# Altium PCB 400535.PcbDoc (part 3 of 3)
Units mil, origin at the board's own origin, x right, y up, seen from the top; angles counter-clockwise.
Board outline 2125.98 x 2500 mil, 4 copper layers (Top Layer, Mid-Layer 1, Mid-Layer 2, Bottom Layer), stack 93.792 mil thick; 80 components, 40 nets, 250 pads, 682 vias.
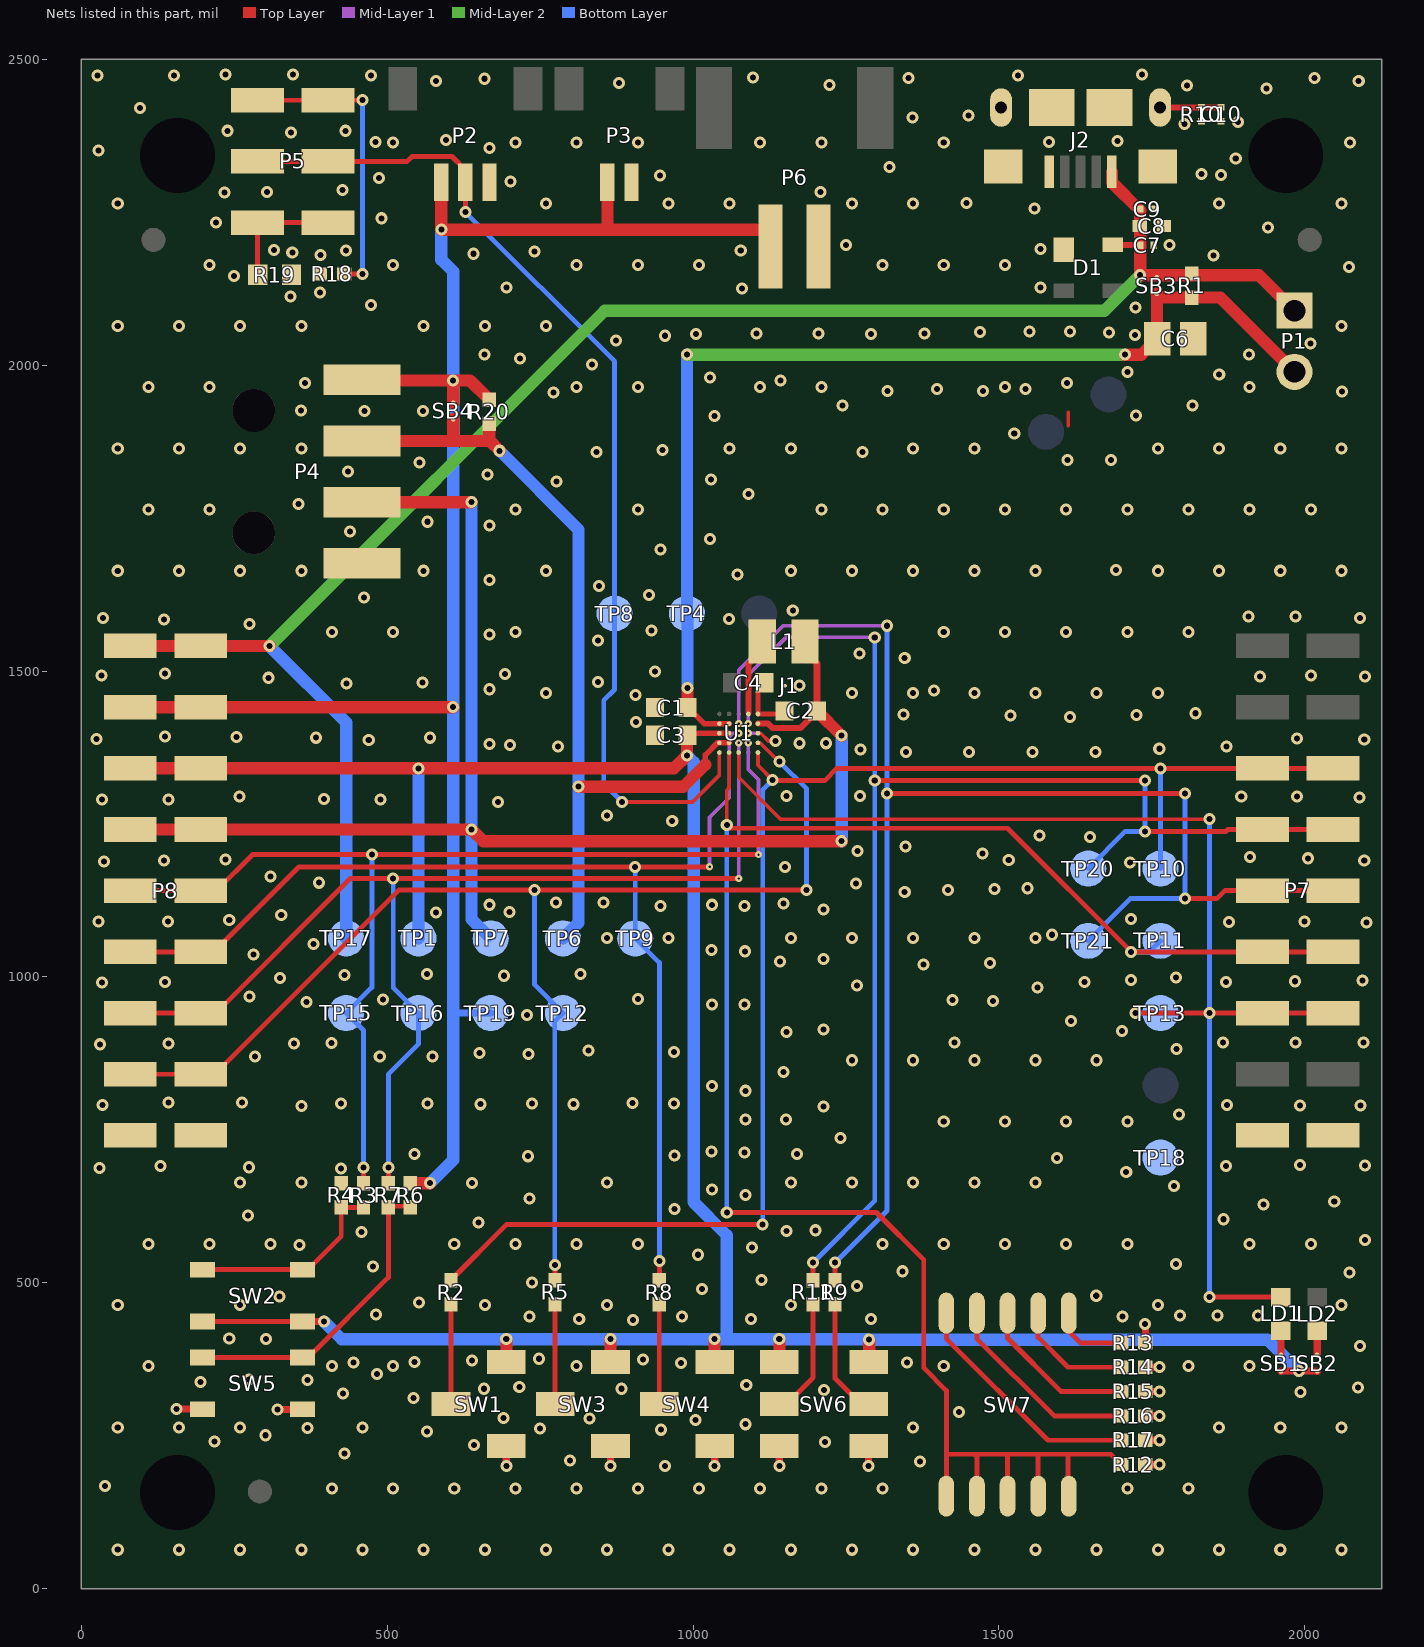
[diagram p4: the nets of this part, all layers, seen from the top]

## Via types
v1: diameter 19.68, hole 9.84, Top Layer to Bottom Layer, tented both sides, 673 vias
v2: diameter 11.81, hole 3.94, Top Layer to Mid-Layer 1, tented top, 8 vias
v3: diameter 11.81, hole 3.94, Top Layer to Mid-Layer 1, tented both sides, 1 vias

## Nets (pads, with @x,y where several pads share a name; then routed paths per layer and width w, separated by ;. In a path a pad name is that pad's centre, name@x,y a point inside that pad or via, vN(x,y) a via of type N, cw(c..) or ccw(c..) an arc to the next point about the centre after c; other vN are vias at no path point) (continued)
ERR: LD1.1 P7.7 TP13.1 U1.E3 | length 2099.9
  Top Layer w5.91: U1.E3@1074.62,1366.81 1074.62,1326.38 1143,1258 v1(1844,1258)
  Top Layer w8: v1(1723,941) P7.7@1930.51,941 P7.7@2045.87,941 ; v1@1844,476.81 LD1.1@1960.87,476.81
  Bottom Layer w8: v1(1723,941) TP13.1@1764,940.95 TP13.1@1764,940.95 ; v1(1844,477) v1(1844,1258)
  other v1: 1844,941
GND: C1.1 C3.1 C6.1 C7.2 C8.2 C9.2 C10.2 D1.1 J1.2 J2.5 P2.1 P3.1 P4.4 P6.1 P7.9 P8.9 R4.2 R10.2 R12.1 R13.1 R14.1 R15.1 R16.1 R17.1 R18.1 R19.1 SW1.3 SW3.3 SW4.3 SW5.2 SW6.1 SW6.4 TP18.1 U1.C4 U1.C5 | length 462
  Top Layer w5.91: 1613,1901 1613,1923
  Top Layer w6: U1.C5@1106.12,1398.31 1110.69,1398.31 1123.44,1385.56 v1(1134.58,1385.56)
  Top Layer w12: v1(156,294) 197.72,294 SW5.2@198.31,293.4 ; v1(321,293) 361.3,293 SW5.2@361.7,293.4 ; v1(695,200.81) SW1.3@695,233.11 ; v1(865.14,200.81) SW3.3@865.14,233.11 ; v1(1035.28,200.81) SW4.3@1035.28,233.11 ; v1(1141.17,200.81) SW6.4@1141.17,233.11 ; v1(1286.83,200.81) SW6.1@1286.83,233.11 ; v1(1739,433) 1739.37,432.63 R13.1@1739.37,402 ; R12.1@1739.37,203 v1(1762.74,203) ; R17.1@1739.37,242.8 v1(1762.74,242.8) ; R16.1@1739.37,282.6 v1(1762.74,282.6) ; R15.1@1739.37,322.4 v1(1762.74,322.4) ; R14.1@1739.37,362.2 v1(1762.74,362.2)
  Mid-Layer 1 w6: v3(1090.37,1398.31) 1103.69,1398.31
  other v1: 59.75,63.87 159.75,63.87 259.75,63.87 359.75,63.87 459.75,63.87 559.75,63.87 659.75,63.87 759.75,63.87 859.75,63.87 959.75,63.87 1059.75,63.87 1159.75,63.87 1259.75,63.87 1359.75,63.87 1459.75,63.87 1559.75,63.87 1659.75,63.87 1759.75,63.87 1859.75,63.87 1959.75,63.87 2059.75,63.87 409.75,163.87 509.75,163.87 609.75,163.87 709.75,163.87 809.75,163.87 909.75,163.87 1009.75,163.87 1109.75,163.87 1209.75,163.87 1309.75,163.87 1709.75,163.87 1809.75,163.87 39,168 954,201 1371,208 799,210 430,221 642,235 1216,240 218,241 301,251 565,257 948,260 750,262 370,263 59.75,263.87 159.75,263.87 259.75,263.87 459.75,263.87 1359.75,263.87 1859.75,263.87 1959.75,263.87 2059.75,263.87 1086,269 1004,276 831,278 690,279 1435,289 543,312 428,319 1993,322 1214,325 658,327 883,327 2087,329 716,330 1087,333 195,338 370,341 274,342 483.6,351.4 109.75,363.87 409.75,363.87 509.75,363.87 809.75,363.87 1409.75,363.87 1809.75,363.87 1909.75,363.87 980,369 445,370 1350,370 545,371 639,373 918,375 748,376 2090,397 302,408 242,409 902,439 814,441 1095,441 1291,441 733,445 982,445 1702,445 1796,447 1857,447 1923,447 482,448 59.75,463.87 259.75,463.87 659.75,463.87 859.75,463.87 1159.75,463.87 1759.75,463.87 2059.75,463.87 552,468 324,478 1659,479 1015,490 1268,495 737,501 1112,505 2073,517 1342,519 477,527 1789,531 1008,546 1096,558 357,562 109.75,563.87 209.75,563.87 309.75,563.87 609.75,563.87 709.75,563.87 809.75,563.87 909.75,563.87 1309.75,563.87 1409.75,563.87 1509.75,563.87 1609.75,563.87 1709.75,563.87 1909.75,563.87 2009.75,563.87 2098,570 458,583 1153,585 1200,586 649,599 1867,604 273,610 970,621 1932,628 2048,633 733,638 1086,644 1031,653 1786,658 639,663 259.75,663.87 359.75,663.87 859.75,663.87 1159.75,663.87 1259.75,663.87 1359.75,663.87 1459.75,663.87 1559.75,663.87 1708,681 425,687 30,688 274,689 130,691 1871,691 2098,692 1992,693 1595,704 730,707 970,708 545,711 1170,711 1084,713 1030,715 1241,737 1409.75,763.87 1509.75,763.87 1609.75,763.87 1709.75,763.87 1086,767 1152,767 1794,775 1213,788 360,789 1992,790 2091,790 35,791 1873,791 653,792 805,792 425,793 566,793 737,793 969,793 901,794 143,795 263,795 1086,814 1031,822 1148,845 1259.75,863.87 1359.75,863.87 1459.75,863.87 1559.75,863.87 1659.75,863.87 284,870 488,870 574,870 731,874 651,876 969,877 829,880 1790,882 31,890 143,891 348,891 409,892 1427,893 1866,893 1985,893 2096,893 1153,910 1701,912 1213,914 1618,928 729,938 1031,955 1084,955 368,959 1490,961 1424,962 493,963 909.75,963.87 275,968 1563,983 1268,986 34,991 137,992 1640,992 1871,992 1984,993 2094,994 1716,995 325,998 1789,999 691,1002 430,1003 565,1005 816,1005 1377,1020 1485,1023 1142,1025 1213,1029 282,1037 1085,1042 1030,1044 380,1054 859.75,1063.87 959.75,1063.87 1159.75,1063.87 1259.75,1063.87 1359.75,1063.87 1459.75,1063.87 1559.75,1063.87 1587,1069 2101,1089 1876,1090 28,1091 142,1091 1999,1091 242,1093 1716,1095 327,1101 580,1105 700,1106 1213,1110 947,1116 1084,1116 667,1118 1031,1118 1148,1120 776,1122 854,1122 1346,1139 1417,1142 1493,1144 1547,1145 1266,1153 389,1154 309.75,1163.87 1150,1180 1714,1187 37,1189 135,1190 2097,1190 1516,1191 236,1192 2005,1194 1910,1196 1473,1202 1269,1206 1347,1213 1649,1229 1566,1231 966,1255 859.75,1263.87 681,1286 34,1290 143,1290 489,1290 397,1291 2089,1293 259,1295 1896,1295 1987,1295 1153,1296 1273,1296 1348,1368 1451.25,1368 1554.5,1368 1657.75,1368 1274,1372 1762,1373 779,1377 1872,1377 701,1379 667,1381 1174,1382 1217,1382 470,1387 2097,1388 25,1389 1987,1390 384,1391 570,1391 254,1392 137,1393 907,1417 1616,1425 1519,1427 1725,1428 1344,1429 1821,1431 906,1461 759.75,1463.87 1259.75,1463.87 1359.75,1463.87 1459.75,1463.87 1559.75,1463.87 1659.75,1463.87 1759.75,1463.87 1394,1468 667,1470.25 1174.03,1476.06 434,1480 558,1481 845,1482 306,1489 1927,1491 2098,1491 33,1493 2010,1493 693,1495 137,1496 938,1499 1346,1521 1272,1529 845,1550 667,1559.5 409.75,1563.87 509.75,1563.87 709.75,1563.87 1409.75,1563.87 1509.75,1563.87 1609.75,1563.87 1709.75,1563.87 1809.75,1563.87 932,1566 275,1577 135,1584 1059,1585 36,1587 2090,1587 1908,1589 1985,1589 1163,1599 462,1620 928,1624 846,1639 667,1648.75 1073,1658 59.75,1663.87 159.75,1663.87 259.75,1663.87 359.75,1663.87 559.75,1663.87 759.75,1663.87 1159.75,1663.87 1259.75,1663.87 1359.75,1663.87 1459.75,1663.87 1559.75,1663.87 1759.75,1663.87 1859.75,1663.87 1959.75,1663.87 2059.75,1663.87 1691,1665 947,1699 1028,1716 439,1728 667,1738 566,1744 109.75,1763.87 209.75,1763.87 709.75,1763.87 909.75,1763.87 1209.75,1763.87 1309.75,1763.87 1409.75,1763.87 1509.75,1763.87 1609.75,1763.87 1709.75,1763.87 1809.75,1763.87 1909.75,1763.87 2009.75,1763.87 355,1773 1091,1789 777,1810 1029,1813 664,1821 436,1826 553,1841 1612,1845 1683,1845 842,1858 1277,1858 950,1861 59.75,1863.87 159.75,1863.87 259.75,1863.87 359.75,1863.87 1059.75,1863.87 1159.75,1863.87 1359.75,1863.87 1459.75,1863.87 1759.75,1863.87 1859.75,1863.87 1959.75,1863.87 2059.75,1863.87 1525,1888 1035,1917 1724,1918 463,1925 559,1925 359,1926 1244,1934 1816,1934 772,1955 2061,1957 1318,1958 1474,1958 1399,1961 1543,1961 109.75,1963.87 209.75,1963.87 809.75,1963.87 909.75,1963.87 1109.75,1963.87 1209.75,1963.87 1509.75,1963.87 1909.75,1963.87 366,1971 1611,1971 1143,1975 1028,1980 1860,1985 1710,1989 835,2001 717,2011 659,2017 1909,2017 2009,2035 874,2040 954,2048 1722,2049 1005,2051 1291,2051 1104,2052 1205,2052 1378,2052 1680,2053 1469,2054 1550,2055 1616,2055 59.75,2063.87 159.75,2063.87 259.75,2063.87 359.75,2063.87 559.75,2063.87 659.75,2063.87 759.75,2063.87 2059.75,2063.87 1723,2094 474,2098 342,2112 390,2119 1080,2125 695,2127 1568,2127 250,2146 2072,2160 209.75,2163.87 509.75,2163.87 809.75,2163.87 909.75,2163.87 1009.75,2163.87 1309.75,2163.87 1409.75,2163.87 1509.75,2163.87 1851,2179 391,2180 641,2182 345,2184 741,2186 433,2187 1078,2187 315,2188 1568,2190 1250,2196 1779,2196 1940,2225 220,2233 491,2240 1558,2256 59.75,2263.87 759.75,2263.87 959.75,2263.87 1059.75,2263.87 1259.75,2263.87 1359.75,2263.87 1859.75,2263.87 2059.75,2263.87 1447,2265 234,2282 304,2283 1208,2283 427,2286 702,2300 487,2306 946,2310 1863,2311 1831,2312 1321,2324 1887,2338 28,2351 667,2355 509.75,2363.87 709.75,2363.87 809.75,2363.87 909.75,2363.87 1109.75,2363.87 1209.75,2363.87 1409.75,2363.87 2074,2364 481,2365 1582,2365 1694,2366 596,2368 343,2380 239,2383 432,2383 1803,2394 1891,2397 1359,2405 1450,2408 96,2420 1937,2452 1807,2457 1223,2458 879,2461 580,2464 2088,2464 659,2468 1352,2469 2016,2469 1098,2470 27,2473 152,2473 474,2473 1531,2473 236,2475 346,2475 1734,2475
ICHG: P7.6 R12.2 SW7.6 SW7.7 SW7.8 SW7.9 SW7.10 TP11.1 U1.E2 | length 3211.4
  Top Layer w5.91: v1(1055.13,1248.13) 1055.13,1305.25 1058.87,1309 U1.E2@1058.87,1366.81
  Top Layer w8: v1(1055.13,615.13) 1299.87,615.13 1377,538 1377,361 1414,324 1414,221 ; v1(1055.13,1248.13) 1060.25,1243 1514,1243 v1(1716,1041) P7.6@1930.51,1041 P7.6@2045.87,1041 ; SW7.6@1414,151.39 1414,221 ; SW7.7@1464,151.39 1464,216 1460,220 ; SW7.8@1514,151.39 1514,220 ; SW7.9@1564,151.39 1564,219 1563,220 ; SW7.10@1614,151.39 1612.94,152.46 1612.94,219.94 1613,220 ; R12.2@1700,203 1683,220 1613,220 ; 1414,221 1415,220 1460,220 ; 1460,220 1514,220 ; 1514,220 1563,220 ; 1563,220 1613,220
  Bottom Layer w8: v1(1055.13,615.13) v1(1055.13,1248.13) ; v1(1716,1041) 1745.94,1041 TP11.1@1764,1059.06
ISET: P8.8 R5.2 TP12.1 U1.D5 | length 2172.3
  Top Layer w5.91: U1.D5@1106.12,1382.56 1109.44,1382.56 1140,1352 v1(1141,1352)
  Top Layer w8: P8.8@80.12,841 P8.8@195.47,841 218,841 519,1142 v1(741,1142) v1(1185.37,1142) ; R5.2@774.59,504.69 v1(774.59,529.59)
  Bottom Layer w8: v1@741,1146 v1(741,1142) 741,987.4 TP12.1@787.4,941 774,927.6 774,530.17 v1(774.59,529.59) ; v1(1141,1352) 1185.67,1307.33 v1@1185.67,1142
MODE: P7.3 R2.2 TP10.1 U1.E5 | length 2423.6
  Top Layer w5.91: U1.E5@1106.12,1366.81 1106.12,1345.88 v1(1130,1322)
  Top Layer w8: R2.2@604.45,504.69 694.87,595.11 v1(1113.89,595.11) ; v1(1130,1322) 1131,1321 1215,1321 1235,1341 v1(1764,1341) P7.3@1930.51,1341 P7.3@2045.87,1341
  Bottom Layer w8: v1(1113.89,595.11) 1113.89,1305.89 v1(1130,1322) ; TP10.1@1764,1177.17 v1(1764,1341)
NetC10_1: C10.1 J2.6@1503.43,2420.96 J2.6@1507.37,2324.51 J2.6@1586.11,2420.96 J2.6@1680.6,2420.96 J2.6@1759.34,2324.51 J2.6@1763.27,2420.96 R10.1 | length 99.8
  Top Layer w10: J2.6@1763.27,2420.96 1763.53,2421.22 C10.1@1863,2421.22
NetL1_1: L1.1 U1.A4 | length 129.5
  Top Layer w9.84: U1.A4@1090.37,1431.77 1090.37,1511.37 1122.52,1543.52 L1.1@1122.52,1548
NetLD1_2: LD1.2 SB1.2 | length 39.6
  Top Layer w12: LD1.2@1960.87,421.81 1960.87,382.43 SB1.2@1961,382.3
NetLD2_2: LD2.2 SB2.2 | length 39.5
  Top Layer w12: LD2.2@2019.92,421.81 2019.92,382.38 SB2.2@2020,382.3
NetP5_1: P5.1 R19.2 | length 200.5
  Top Layer w8: R19.2@288.44,2148 288.44,2232.49 P5.1@288,2232.93 P5.1@403.35,2232.93
NetP5_3: P5.3 R18.2 | length 486.3
  Top Layer w8: P5.3@288,2432.93 P5.3@403.35,2432.93 v1(459.93,2432.93) ; R18.2@429.68,2149 v1(460,2149)
  Bottom Layer w8: v1(459.93,2432.93) v1(459.93,2432.93) v1(460,2149)
NetR2_1: R2.1 SW1.2 | length 163.3
  Top Layer w8: SW1.2@604.45,302.01 R2.1@604.45,465.31
NetR3_1: R3.1 R4.1 SW2.1 | length 333
  Top Layer w8: SW2.1@198.31,521.57 370.58,521.58 425,576 R4.1@425,623.31 R3.1@461.42,623.31
NetR5_1: R5.1 SW3.2 | length 163.3
  Top Layer w8: SW3.2@774.59,302.01 R5.1@774.59,465.31
NetR6_1: R6.1 R7.1 SW5.1 | length 510.3
  Top Layer w8: SW5.1@198.31,378.05 SW5.1@361.7,378.05 371.05,378.05 501.96,508.96 501.96,625.31 R6.1@538,625.31
NetR8_1: R8.1 SW4.2 | length 163.3
  Top Layer w8: SW4.2@944.72,302.01 R8.1@944.72,465.31
NetR9_1: R9.1 SW6.2 | length 193.5
  Top Layer w8: R9.1@1232,465.31 1232,344 1273.99,302.01 SW6.2@1286.83,302.01
NetR11_1: R11.1 SW6.5 | length 193
  Top Layer w8: SW6.5@1141.17,302.01 1153.01,302.01 1196,345 R11.1@1196,465.31
NetR13_2: R13.2 SW7.1 | length 123.5
  Top Layer w8: SW7.1@1614,450.61 1614,421 1633,402 R13.2@1700,402
NetR14_2: R14.2 SW7.2 | length 195.8
  Top Layer w8: SW7.2@1564,450.61 1564,411 1612.8,362.2 R14.2@1700,362.2
NetR15_2: R15.2 SW7.3 | length 262.9
  Top Layer w8: SW7.3@1514,450.61 1514,410 1601.6,322.4 R15.2@1700,322.4
NetR16_2: R16.2 SW7.4 | length 330
  Top Layer w8: SW7.4@1464,450.61 1464,409 1590.4,282.6 R16.2@1700,282.6
NetR17_2: R17.2 SW7.5 | length 396.4
  Top Layer w8: SW7.5@1414,450.61 1414,409 1580.2,242.8 R17.2@1700,242.8
NTC: P2.2 P5.2 TP8.1 U1.E1 | length 1720.4
  Top Layer w5.91: v1(884,1286) 999,1286 1043.13,1330.13 U1.E1@1043.13,1366.81
  Top Layer w8: P5.2@288,2332.93 P5.2@403.35,2332.93 532.93,2332.93 541,2341 606,2341 628,2319 P2.2@628,2299.02 v1(628,2250)
  Bottom Layer w8: v1(628,2250) 871.89,2006.11 871.89,1941 871.89,1469.89 854,1452 854,1316 v1(884,1286)
PVSS: C2.1 C4.1 J1.1 U1.A5 | length 101
  Top Layer w7.87: C4.1@1116.94,1480.98 1106.12,1470.16 U1.A5@1106.12,1429.8 1144.5,1429.8 C2.1@1149.42,1434.72
SHPACT: P8.5 R3.2 TP15.1 U1.D4 | length 1807.2
  Top Layer w8: P8.5@80.12,1141 P8.5@195.47,1141 221,1141 280,1200 v1(475,1200) v2(1107,1200) ; R3.2@461.42,662.69 v1(461.42,688.96)
  Mid-Layer 1 w5.91: v2(1090.37,1382.56) 1090.37,1339 1107,1322.37 v2(1107,1200)
  Bottom Layer w8: v1(461.42,688.96) 461.42,912.65 TP15.1@433.07,941 475,982.93 v1(475,1200)
SHPHLD: P8.7 R7.2 TP16.1 U1.D3 | length 1847
  Top Layer w8: P8.7@80.12,941 P8.7@195.47,941 220,941 440,1161 v1(510,1161) v2(1074.62,1161) ; R7.2@501.96,662.69 v1(501.96,688.96)
  Mid-Layer 1 w5.91: v2(1074.62,1161) v2(1074.62,1382.56)
  Bottom Layer w8: v1(501.96,688.96) 501.96,840.96 551.18,890.18 TP16.1@551.18,941 510,982.18 v1(510,1161) v1@510,1165
VBAT: P2.3 P3.2 P4.1 P6.2 P8.2 R6.2 R20.2 SB4.2 TP19.1 | length 3180.9
  Top Layer w20: P8.2@80.12,1441 P8.2@195.47,1441 v1(608,1441) ; P4.1@458.01,1975 v1(608,1975) ; R6.2@538,662.69 538.31,663 v1(570,663) ; v1(588.63,2221.37) 862,2221.37 ; v1@588.63,2224.37 P2.3@588.63,2299.02 ; SB4.2@608,1938.3 v1(608,1975) ; R20.2@667,1943.69 635.69,1975 v1(608,1975) ; P3.2@860.05,2299.02 860.05,2223.31 862,2221.37 ; P6.2@1126.63,2193.7 1126.63,2221.37 862,2221.37
  Bottom Layer w12: 608,941 TP19.1@669.29,941
  Bottom Layer w20: v1(570,663) 608,701 608,941 v1(608,1975) 608,2153 588.63,2172.37 v1(588.63,2221.37)
VBAT_HF: P4.2 R20.1 SB4.1 TP6.1 U1.D1 U1.D2 | length 1438
  Top Layer w9: 1020,1347 1020,1363 1039.56,1382.56 U1.D1@1043.13,1382.56 U1.D2@1058.87,1382.56
  Top Layer w20: P4.2@459.01,1876 608,1876 ; SB4.1@608,1911.7 608,1876 ; R20.1@667,1904.31 667,1877 668,1876 ; v1(684,1860) 668,1876 ; v1(813,1311) 984,1311 1020,1347 ; 608,1876 668,1876
  Bottom Layer w20: v1(684,1860) 813,1731 v1@813,1315 ; TP6.1@787.4,1062.99 813,1088.59 v1(813,1311)
VBUS: C7.1 C8.1 C9.1 D1.4 J2.1 P1.1 P8.1 R1.2 SB3.1 TP17.1 | length 2940.5
  Top Layer w10: D1.4@1686.35,2196.4 1686.76,2196 C7.1@1730.78,2196
  Top Layer w20: P8.1@80.12,1541 P8.1@195.47,1541 v1(308,1541) ; J2.1@1684.53,2315.65 1684.53,2298.47 1730.78,2252.22 1730.78,2227 C7.1@1730.78,2196 v1(1730.78,2147.22) 1731,2147 1758,2147 1815,2147 1925,2147 P1.1@1983,2089 P1.1@1982.7,2088.7
  Mid-Layer 2 w20: v1(308,1541) 855.7,2088.7 1672.26,2088.7 v1(1730.78,2147.22)
  Bottom Layer w20: v1(308,1541) 433.07,1415.93 TP17.1@433.07,1062.99
VBUS_HF: C1.2 C6.2 P1.2 R1.1 SB3.2 TP4.1 U1.B1 U1.B2 | length 1786.3
  Top Layer w9: C1.2@990.96,1440.3 991.7,1440.3 1017.94,1414.06 U1.B1@1043.13,1414.06 U1.B2@1058.87,1414.06
  Top Layer w20: C1.2@990.96,1440.3 v1(990.96,1471.96) ; v1(1706,2017) 1732.47,2017 C6.2@1758.47,2043 SB3.2@1758.47,2116.24 ; SB3.2@1758,2116.72 SB3.2@1758.47,2116.24 ; P1.2@1983,1989 1861.67,2110.33 R1.1@1815,2110.33 1764.38,2110.33 SB3.2@1758.47,2116.24
  Mid-Layer 2 w20: v1(990,2017) v1(1706,2017)
  Bottom Layer w20: v1(990,2017) TP4.1@990,1594 990.96,1593.04 v1(990.96,1471.96)
VOUTB: C2.2 L1.2 P4.3 P8.4 TP7.1 U1.B5 | length 2530.9
  Top Layer w9.84: U1.B5@1106.12,1414.06 1122.85,1414.05 1129.74,1407.17 1176,1407.17 C2.2@1202.57,1433.74 ; L1.2@1182.84,1532.16 L1.2@1182.84,1548
  Top Layer w12: L1.2@1182.84,1532.16 1202.57,1512.43 C2.2@1202.57,1434.72
  Top Layer w20: P8.4@80.12,1241 P8.4@195.47,1241 v1(638,1241) 657,1222 v1(1243,1222) ; P4.3@459.01,1776 v1(638,1776) ; C2.2@1202.57,1434.72 v1(1243,1394.3)
  Bottom Layer w20: v1(638,1776) v1(638,1241) 638,1094.28 TP7.1@665,1067.28 ; v1(1243,1222) v1(1243,1394.3)
VOUTBSET0: P7.4 R11.2 TP20.1 U1.B4 | length 2355
  Top Layer w8: R11.2@1196,504.69 v1(1196,533) ; v1(1297,1321) v1(1739,1321) ; v1(1739,1238) 1871,1238 1874,1241 P7.4@1930.51,1241 P7.4@2045.87,1241
  Mid-Layer 1 w6: v2(1090.37,1414.06) 1090.37,1493.37 1152,1555 v1(1297,1555)
  Bottom Layer w8: v1(1196,533) 1297,634 v1(1297,1321) v1(1297,1555) ; TP20.1@1645.89,1177.17 1706.72,1238 v1(1739,1238) v1(1739,1321)
VOUTBSET1: P7.5 R9.2 TP21.1 U1.B3 | length 2557.4
  Top Layer w8: R9.2@1232,504.69 v1(1232,533) ; v1(1317,1300) v1(1804,1300) ; v1(1804,1128) 1856,1128 1869,1141 P7.5@1930.51,1141 P7.5@2045.87,1141
  Mid-Layer 1 w6: v2(1074.62,1414.06) 1074.62,1501.62 1147,1574 v1(1317,1574)
  Bottom Layer w8: v1(1232,533) 1317,618 v1(1317,1300) v1(1317,1574) ; TP21.1@1645.89,1059.06 1714.83,1128 v1(1804,1128) v1(1804,1300)
VSYS: C3.2 P8.3 SB1.1 SB2.1 SW1.1 SW2.2 SW3.1 SW4.1 SW6.3 SW6.6 TP1.1 U1.C1 U1.C2 | length 4350.8
  Top Layer w7.87: C3.2@990,1394.06 C3.2@990.96,1395.02 C3.2@994.24,1398.31
  Top Layer w8: SW2.2@198.31,436.93 SW2.2@361.7,436.93
  Top Layer w9: C3.2@994.24,1398.31 U1.C1@1043.13,1398.31 U1.C2@1058.87,1398.31
  Top Layer w12: SW2.2@361.7,436.93 v1(396.93,436.93) ; SB1.1@1961,355.7 1961.3,356 v1(1990,356) 2019.7,356 SB2.1@2020,355.7
  Top Layer w20: P8.3@80.12,1341 P8.3@195.47,1341 v1@551,1341 ; v1(551.18,1340.82) v1@551,1341 ; v1(694.72,408) 695,407.72 SW1.1@695,370.91 ; v1(864.86,408) 865.14,407.72 SW3.1@865.14,370.91 ; C3.2@990,1394.06 v1(990,1362) 969,1341 v1@551,1341 ; v1(1035,408) 1035.28,407.72 SW4.1@1035.28,370.91 ; v1(1140.89,408) 1141.17,407.72 SW6.6@1141.17,370.91 ; v1(1287.72,407.09) 1288,406.82 SW6.3@1288,370
  Bottom Layer w20: v1(396.93,436.93) 425.85,408 v1(694.72,408) v1(864.86,408) v1(1035,408) 1055,408 ; TP1.1@551.18,1062.99 v1(551.18,1340.82) ; v1(990,1362) 1001,1351 1001,632 1055,578 1055,408 ; v1(1990,356) 1938.91,407.09 v1(1287.72,407.09) 1286.82,408 v1(1140.89,408) 1055,408
VTERM: P8.6 R8.2 TP9.1 U1.C3 | length 1935.7
  Top Layer w8: P8.6@80.12,1041 P8.6@195.47,1041 217,1041 356,1180 v1(905.51,1180) v2(1027,1180) ; R8.2@944.72,504.69 945,504.96 v1(945,536)
  Mid-Layer 1 w6: v2@1027,1184 1027,1261 1059,1293 1059,1392 1065.31,1398.31 v2(1074.62,1398.31)
  Bottom Layer w8: v1(905.51,1180) TP9.1@905.51,1062.99 945,1023.5 v1(945,536)
pads on no net: Fid1.0 Fid2.0 Fid3.0 J2.4 J2.6@1503.43,2420.96 J2.6@1763.27,2420.96 P2.0 P3.0 P4.0 P6.0
copper on no net:
  other v1: 1633.35,2368.31

## Polygon pours and split planes (outlines as drawn)
GND on Mid-Layer 1 "Mid_Layer_1-GND" (solid, remove dead copper, pour order 7): 0,0 0,2500 2125.98,2500 2125.98,0
GND on Mid-Layer 2 "Mid_Layer_2-GND" (solid, remove dead copper, pour order 9): 0,0 0,2500 2125.98,2500 2125.98,0
GND on Top Layer "Top_Layer-GND" (solid, remove dead copper, pour order 8): 0,0 0,2500 2125.98,2500 2125.98,0
GND on Bottom Layer "Bottom_Layer-GND" (solid, remove dead copper, pour order 6): 0,0 0,2500 2125.99,2500 2125.98,0

## Other copper
Top Layer:
  rectangle net PVSS: 1107.1,1428.82 1156.31,1496.73
  pour cut-out: 1167.14,1492.79 1167.14,1461.3 1187.81,1461.3 1187.81,1492.79
  pour cut-out: 1118.87,1594 1172.06,1594 1172.06,1504.48 1118.93,1504.48
  pour cut-out: 1937.84,391.83 1937.84,445 2044.16,445 2044.16,391.91
  pour cut-out: 1109.56,1455.89 1109.56,1440.14 1125.31,1440.14 1125.31,1455.89
Mid-Layer 1:
  pour cut-out: 2040.54,391.5 2000.36,391.5 2000.36,346.5 2040.2,346.5
  pour cut-out: 1778.54,2152.52 1738.36,2152.52 1738.36,2107.52 1778.2,2107.52
  pour cut-out: 628,1902.93 628,1949 588,1949 588,1903.24
  pour cut-out: 1981.17,391.5 1941,391.5 1941,346.5 1980.83,346.5
Bottom Layer:
  pour cut-out: 484,977 499,977 499,983
  pour cut-out: 473,850 499,850 499,848 487,836

## Silkscreen, mask and mechanical layers (free items; w line width, h text height)
Top Overlay:
  drawing of 57 lines, arcs and shapes, not listed
  text "NTC" at 130,2439 h60
  text "+" at 572,2227 h27
  text "-" at 652,2227 h27
  text "+" at 844,2227 h27
  text "-" at 883,2227 h27
  text "NTC" at 648,2166.14 h55 r90
  text "+" at 1110,2087 h27
  text "-" at 1192,2087 h27
  text "VBAT" at 645,1980.14 h55
  text "Current" at 732,1928.14 h55
  text "Measurement" at 732,1876.14 h55
  text "VBAT_HF" at 645,1822.14 h55
  text "VOUTB" at 645,1747.14 h55
  text "'.PCBRevision'" at 2100,1680 h25 r90
  text "'.PCBNumber'" at 2064.87,1678.64 h80 r90
  text "nPM1100-EK" at 1051.92,1666 h150
  text "GND" at 645,1651.14 h55
  text "VBUS" at 259,1519 h70
  text "D-" at 1796.25,1519 h70
  text "VBAT" at 259,1420.22 h70
  text "D+" at 1782.73,1420.22 h70
  text "VSYS" at 259,1319.76 h70
  text "MODE" at 1677.03,1319.76 h70
  text "VOUTB" at 259,1219.3 h70
  text "VOUTBSET0" at 1484.76,1219.3 h70
  text "ICHG" at 609,1156 h60
  text "Charge Current" at 820.5,1156 h60
  text "R_ICHG" at 1248.15,1156 h60
  text "SHPACT" at 259,1118.83 h70
  text "VOUTBSET1" at 1491.87,1118.83 h70
  text "1" at 698,1081 h75
  text "0R" at 1294.51,1081 h75
  text "400mA" at 928.28,1080.12 h75
  text "VTERM" at 259,1020.06 h70
  text "ICHG" at 1708.86,1018.37 h70
  text "2" at 698,974.4 h75
  text "1k" at 1294.51,974.4 h75
  text "250mA" at 928.28,973.97 h75
  text "SHPHLD" at 259,919.59 h70
  text "ERR" at 1730.08,919.59 h70
  text "3" at 698,869 h75
  text "2.7k" at 1294.51,869 h75
  text "150mA" at 928.28,867.82 h75
  text "ISET" at 259,819.13 h70
  text "CHG" at 1724.95,819.13 h70
  text "4" at 698,762.46 h75
  text "12k" at 1294.51,762.4 h75
  text "50mA" at 928.28,761.67 h75
  text "GND" at 259,718.67 h70
  text "GND" at 1724.25,718.67 h70
  text "5" at 698,657.27 h75
  text "20mA" at 928.28,656.4 h75
  text "27k" at 1294.51,656.4 h75
  text "ERR" at 1989,512 h60 r90
  text "CHG" at 2045,512 h60 r90
  text "1" at 1602,498.76 h70
  text "5" at 1406,498 h70
  text "4" at 1452,498 h70
  text "3" at 1502,498 h70
  text "2" at 1551,498 h70
  text "SHPACT" at 111,431 h50 r90
  text "OFF" at 1679,428.58 h70
  text "VSYS" at 411,335.69 h70
  text "GND" at 411,230.69 h70
  text "SHPHLD" at 111,230 h50 r90
  text "ON" at 1684,129.58 h70
  text "MODE" at 597.84,105 h50
  text "ISET" at 767.68,105 h50
  text "VTERM" at 937.68,104.46 h50
  text "VOUTBSET" at 1132,105 h50
  text "ICHG" at 1450,47.58 h70
  text "0   1" at 1168,47 h60
Bottom Overlay:
  drawing of 908 lines, arcs and shapes, not listed
Board Outline:
  the board outline again, w6
PCB Info:
  lines w5.51: 1043.13,1429.8 ccw(c1033.81,1429.8) 1040.4,1436.39 1035.39,1441.39 cw(c1074.97,1480.97) 1019,1480.97 1019,1620.58 cw(c1134,1620.58) 1052.68,1701.9 1249.1,1898.32 cw(c1330.42,1817) 1330.42,1932 1578.12,1932 ccw(c1578.12,1950.21) 1591,1937.33 ; 1058.87,1429.8 cw(c1060.68,1431.61) 1058.13,1431.61 1058.13,1435.21 ccw(c1046.87,1435.21) 1054.83,1443.17 1046,1452 cw(c1074.97,1480.97) 1034,1480.97 1034,1620.58 cw(c1134,1620.58) 1063.29,1691.29 1259.71,1887.71 cw(c1330.42,1817) 1330.42,1917 1578.12,1917 cw(c1578.12,1898.79) 1591,1911.67 ; 1591,1910.67 cw(c1606.29,1895.37) 1606.29,1917 1622.12,1917 cw(c1622.12,1898.79) 1635,1911.67 ; 1591,1938.33 ccw(c1606.29,1953.63) 1606.29,1932 1647.12,1932 ccw(c1647.12,1950.21) 1660,1937.33 ; 1633.35,2315.65 cw(c1620.57,2302.87) 1638.65,2302.87 1638.65,2196.02 cw(c1538.65,2196.02) 1609.36,2125.31 1605.65,2121.6 1611.21,2116.03 cw(c1540.5,2045.32) 1640.5,2045.32 1640.5,1611.92 ccw(c1755.5,1611.92) 1674.18,1530.6 1683.39,1521.39 ccw(c1764.01,1602.01) 1764.01,1488 1842.09,1488 cw(c1842.09,1388) 1912.8,1458.71 1930.51,1441 2045.87,1441 ; 1658.94,2315.65 ccw(c1671.73,2302.87) 1653.65,2302.87 1653.65,2195.73 ccw(c1753.65,2195.73) 1682.94,2125.02 1686.35,2121.6 1684.79,2120.03 ccw(c1755.5,2049.32) 1655.5,2049.32 1655.5,1611.92 ccw(c1755.5,1611.92) 1684.79,1541.21 1694,1532 ccw(c1764.01,1602.01) 1764.01,1503 1851.09,1503 ccw(c1851.09,1603) 1921.8,1532.29 1930.51,1541 2045.87,1541
  text "90ohm impedance / differential pair" at 595,1122 h60
Bottom Component Info:
  text "D_N" at 1644.72,1725 h60 r270
  text "NTC" at 831.72,1687 h60 r270
  text "VBUS_HF" at 945.72,1687.06 h60 r270
  text "DEC" at 1071.72,1687 h60 r270
  text "D_P" at 1532.72,1662 h60 r270
  text "VBUS" at 405.72,1145.06 h60 r270
  text "VSY" at 519.39,1145.06 h60 r270
  text "VOUTB" at 633.05,1145.06 h60 r270
  text "VBAT_HF" at 751.72,1145.06 h60 r270
  text "MODE" at 1713.94,1135.72 h60
  text "ICHG" at 1714,1017.72 h60
  text "VTERM" at 1713.94,899 h60
  text "ERR" at 1714,782 h60
  text "ISET" at 744.72,636 h60 r270
  text "VBAT" at 630,626.06 h60 r270
  text "SHPACT" at 393.72,506.04 h60 r270
  text "SHPHLD" at 514.72,506.04 h60 r270
  text "GND" at 1604.72,483 h60 r270
  text "CHG" at 1723.72,483 h60 r270

## Dimensions
2125.98,0 to 1968.5,2342.52 on Dimension
2125.98,0 to 1968.5,157.48 on Dimension
0,0 to 1968.5,157.48 on Dimension
0,0 to 157.48,157.48 on Dimension
2125.98,2500 to 2125.98,0 on Dimension
0,0 to 2125.98,0 on Dimension

## Text inside footprints (layer, text, board x,y; h text height)
SW7: Top Assembly (Mech7) "5" at 1427,416.86 h23.62 r180; Top Assembly (Mech7) "4" at 1476.82,417.14 h23.62 r180; Top Assembly (Mech7) "3" at 1526.98,416.86 h23.62 r180; Top Assembly (Mech7) "2" at 1576.98,417.14 h23.62 r180; Top Assembly (Mech7) "1" at 1622.82,417.14 h23.62 r180